# Altium PCB Main-PCB-v1.0.PcbDoc (part 5 of 5)
Units mil, origin at the board's own origin, x right, y up, seen from the top; angles counter-clockwise.
Board outline 8760 x 2778 mil, 2 copper layers (Top Layer, Bottom Layer), stack 57 mil thick; 252 components, 204 nets, 813 pads, 473 vias.
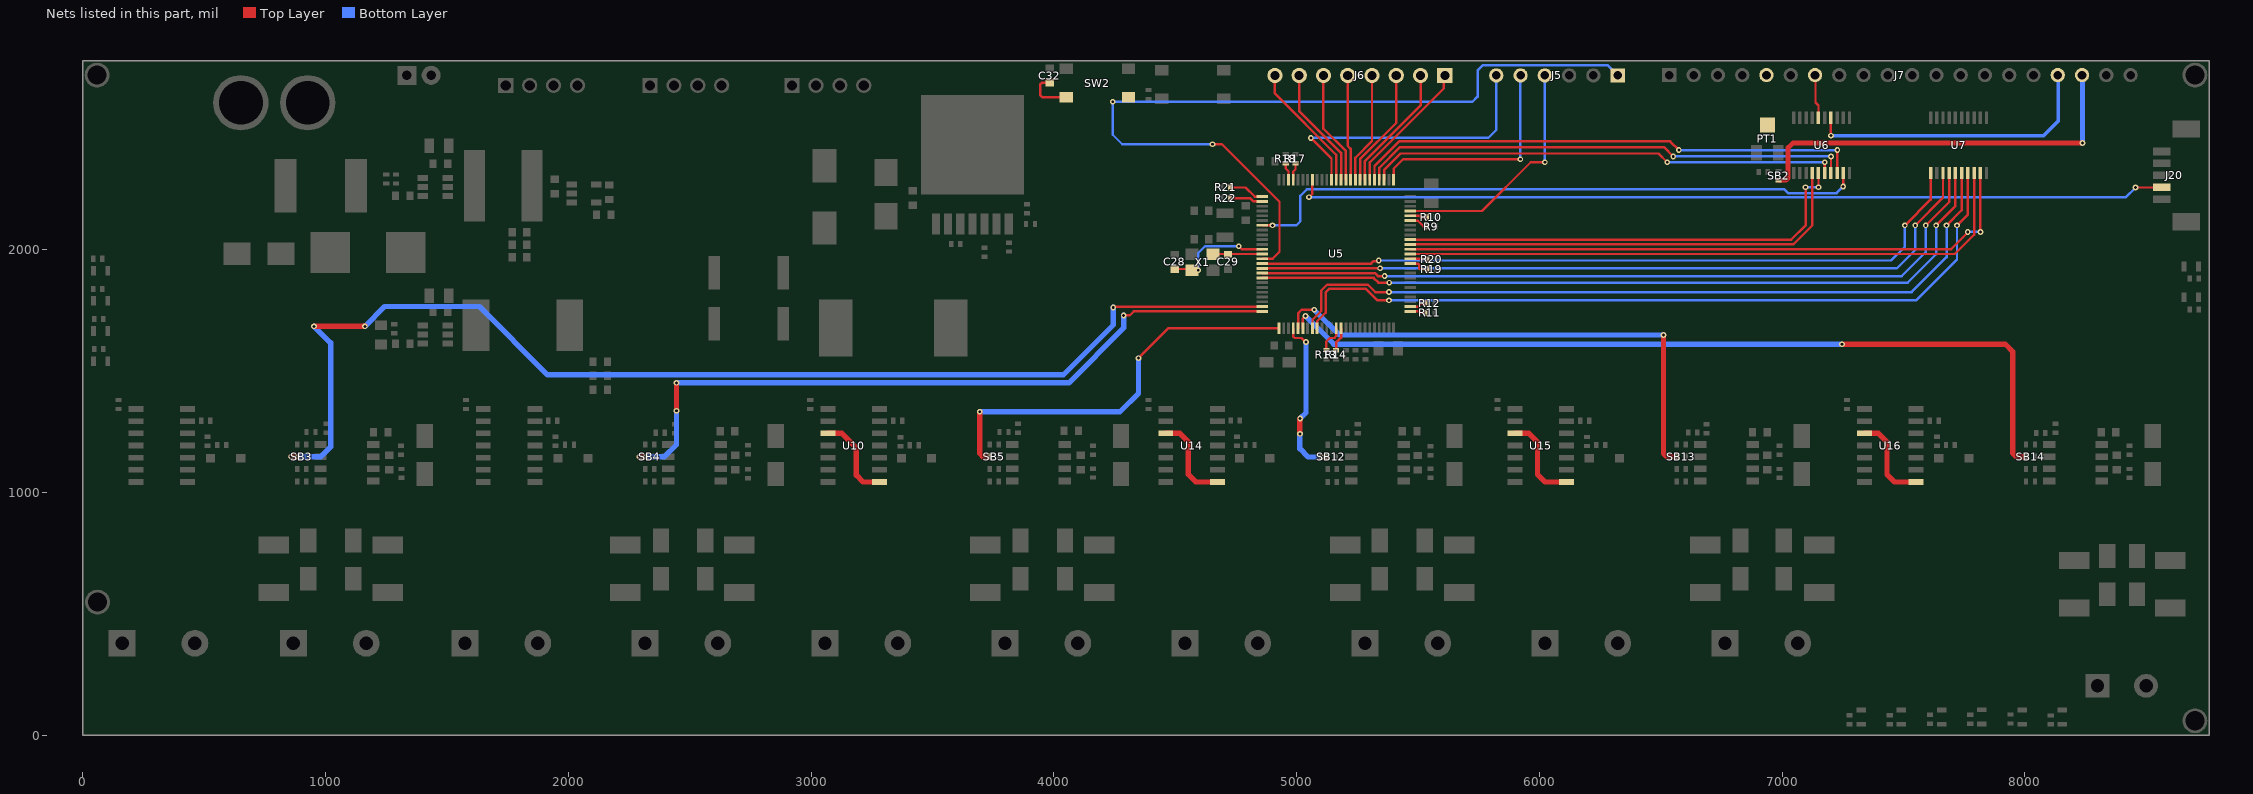
[diagram p3: the nets of this part, all layers, seen from the top]

## Via types
v1: diameter 23.62, hole 11.81, Top Layer to Bottom Layer, 473 vias

## Nets (pads, with @x,y where several pads share a name; then routed paths per layer and width w, separated by ;. In a path a pad name is that pad's centre, name@x,y a point inside that pad or via, vN(x,y) a via of type N, cw(c..) or ccw(c..) an arc to the next point about the centre after c; other vN are vias at no path point) (continued)
NetU10_3: U10.3 U10.8 | length 361.2
  Top Layer w22: U10.3@3069.5,1243 3127.3,1243 3187,1183.3 3187,1071 3215,1043 U10.8@3282.09,1043
NetU14_3: U14.3 U14.8 | length 373.9
  Top Layer w22: U14.3@4461.5,1243 4519.3,1243 4554.3,1208 4554.3,1074 4585.3,1043 U14.8@4674.09,1043
NetU15_3: U15.3 U15.8 | length 373.9
  Top Layer w22: U15.3@5899.8,1243 5957.6,1243 5992.6,1208 5992.6,1074 6023.6,1043 U15.8@6112.39,1043
NetU16_3: U16.3 U16.8 | length 373.9
  Top Layer w22: U16.3@7339.8,1243 7397.6,1243 7432.6,1208 7432.6,1074 7463.6,1043 U16.8@7552.39,1043
NRST: C32.2 J5.1 SW2.1 SW2.2 U5.14 | length 3646.8
  Top Layer w10: C32.2@3983,2687 3951,2687 3944,2680 3944,2637 3954.06,2626.94 SW2.1@4051.79,2626.94 ; v1(4654,2434) 4693,2434 4930,2197 4930,1991 4901.32,1962.32 U5.14@4858.68,1962.32
  Bottom Layer w10: v1(4654,2434) 4282,2434 4243,2473 v1(4243,2609) 5725,2609 5746,2630 5746,2738 5768,2760 6280.56,2760 J5.1@6323,2717.56
PC0: U5.15 U7.1 | length 3022.8
  Top Layer w10: U5.15@4858.68,1942.63 5307.19,1942.63 5316.95,1952.39 5336.39,1952.39 v1(5339,1955) ; v1(7506,2100) 7612.05,2206.05 U7.1@7612.05,2314.83
  Bottom Layer w10: v1(5339,1955) 7449,1955 7506,2012 v1(7506,2100)
PC1: U5.16 U7.3 | length 3084.2
  Top Layer w10: U5.16@4858.68,1922.94 v1@5343.94,1922.94 ; v1(7549,2100) 7663.23,2214.23 U7.3@7663.23,2314.83
  Bottom Layer w10: v1(5344.47,1923.47) 7473.47,1923.47 7549,1999 v1(7549,2100)
PC2: U5.17 U7.4 | length 3144.3
  Top Layer w10: U5.17@4858.68,1903.26 5322.74,1903.26 5335,1891 v1(5363,1891) ; v1(7592,2100) 7688.82,2196.82 U7.4@7688.82,2314.83
  Bottom Layer w10: v1(5363,1891) 7493,1891 7592,1990 v1(7592,2100)
PC3: U5.18 U7.5 | length 3199.6
  Top Layer w10: U5.18@4858.68,1883.57 5317.74,1883.57 5337.31,1864 v1(5382,1864) ; v1(7635,2100) 7714.2,2179.2 7714.2,2314.62 U7.5@7714.41,2314.83
  Bottom Layer w10: v1(5382,1864) 7518,1864 7635,1981 v1(7635,2100)
PC4: U5.33 U7.6 | length 3199.9
  Top Layer w10: U5.33@5065.37,1676.88 5066,1677.51 5066,1711 5102,1747 5102,1831.46 5126.54,1856 5293.46,1856 5324.46,1825 v1(5381,1825) ; v1(7678,2100) 7740,2162 U7.6@7740,2314.83
  Bottom Layer w10: v1(5381,1825) 7534,1825 7678,1969 v1(7678,2100)
PC5: U5.34 U7.7 | length 3231.2
  Top Layer w10: U5.34@5085.06,1676.88 5085,1676.94 5085,1705 5120,1740 5120,1824 5134,1838 5286,1838 5333,1791 v1(5381,1791) ; v1(7721,2100) 7765.59,2144.59 U7.7@7765.59,2314.83
  Bottom Layer w10: v1(5381,1791) 7552,1791 7721,1960 v1(7721,2100)
PC6: U5.63 U7.8 | length 2619.4
  Top Layer w10: U5.63@5468.91,1982 7711.84,1982 7791.18,2061.34 U7.8@7791.18,2325.61
PC7: U5.64 U7.9 | length 2622.4
  Top Layer w10: U5.64@5468.91,2001.68 7696.61,2001.68 7765,2070.07 v1(7765,2073) ; U7.9@7816.77,2314.83 7817.39,2314.21 v1@7817.39,2073
  Bottom Layer w10: v1(7765,2073) v1(7818,2073)
PC8: U5.65 U6.4 | length 1903.3
  Top Layer w10: U5.65@5468.91,2021.37 7046.37,2021.37 7124.61,2099.61 U6.4@7124.61,2314.83
PC9: U5.66 U6.5 | length 1920.6
  Top Layer w10: U5.66@5468.91,2041.06 7038.22,2041.06 7097,2099.84 v1(7097,2257) ; v1(7150.2,2257) U6.5@7150.2,2314.83
  Bottom Layer w10: v1(7097,2257) v1(7150.2,2257)
PC10: U5.78 U6.6 | length 1945
  Top Layer w10: U5.78@5360.65,2287.12 5360.65,2328.65 5428,2396 6491,2396 v1(6527,2360) ; U6.6@7175.8,2314.83 7175.9,2314.93 7175.9,2359.9 v1(7176,2360)
  Bottom Layer w10: v1(6527,2360) v1(7176,2360)
PC11: U5.79 U6.7 | length 2031.2
  Top Layer w10: U5.79@5340.96,2287.12 5340.96,2336.8 5426.16,2422 6514,2422 v1(6552,2384) ; U6.7@7201.39,2314.83 7201.69,2315.13 7201.69,2383.69 v1(7202,2384)
  Bottom Layer w10: v1(6552,2384) v1(7202,2384)
PC12: U5.80 U6.8 | length 2116.9
  Top Layer w10: U5.80@5321.28,2287.12 5321.28,2344.95 5422.32,2446 6539,2446 v1(6575,2410) ; U6.8@7226.98,2314.83 7227.49,2315.34 7227.49,2409.49 v1(7228,2410)
  Bottom Layer w10: v1(6575,2410) v1(7228,2410)
PC13: U5.7 U6.9 | length 2588.6
  Top Layer w10: U5.7@4858.68,2100.11 4877.3,2100 v1(4901,2100) ; v1(7252,2260) 7252.28,2260.28 7252.28,2314.54 U6.9@7252.57,2314.83
  Bottom Layer w10: v1(4901,2100) 4999,2100 5016,2117 5016,2222 5042,2248 7009.8,2248 7024.8,2233 7225,2233 v1(7252,2260)
PD0: J6.1 U5.81 | length 558.6
  Top Layer w10: U5.81@5301.59,2287.12 5301.59,2359.59 5607,2665 5607,2713.56 J6.1@5611,2717.56
PD1: J6.2 U5.82 | length 525.3
  Top Layer w10: U5.82@5281.91,2287.12 5281.91,2364.91 5511,2594 J6.2@5511,2717.56
PD2: J6.3 U5.83 | length 492.1
  Top Layer w10: U5.83@5262.22,2287.12 5262.22,2373.22 5411,2522 J6.3@5411,2717.56
PD3: J6.4 U5.84 | length 458.8
  Top Layer w10: U5.84@5242.54,2287.12 5242.54,2378.54 5311,2447 J6.4@5311,2717.56
PD4: J6.5 U5.85 | length 435.4
  Top Layer w10: J6.5@5211,2717.56 5211,2427 5222.85,2415.15 U5.85@5222.85,2287.12
PD5: J6.6 U5.86 | length 487.3
  Top Layer w10: J6.6@5111,2736.27 5111,2497.68 5203.17,2405.51 U5.86@5203.17,2287.12
PD6: J6.7 U5.87 | length 512.8
  Top Layer w10: J6.7@5011,2728.46 5011,2570.84 5183.48,2398.36 U5.87@5183.48,2287.12
PD7: J6.8 U5.88 | length 546.5
  Top Layer w10: J6.8@4911,2728.94 4911,2643 5163.8,2390.2 U5.88@5163.8,2287.12
RS485_CH1_DE_RE: SB3.1 U5.24 | length 4945.4
  Top Layer w10: v1(4245,1762) 4247.56,1764.56 4857.77,1764.56 U5.24@4858.68,1765.46
  Top Layer w22: v1(858.59,1147) SB3.1@884.3,1147 ; v1(953,1684) 1159.56,1684 1161.56,1686 v1@1162,1686
  Bottom Layer w22: v1(858.59,1147) 981,1147 1021,1187 1021,1616 v1(953,1684) ; v1(1162,1684) 1243.46,1765.46 1633.54,1765.46 1915,1484 4039,1484 4245,1690 v1(4245,1762)
RS485_CH2_DE_RE: SB4.1 U5.25 | length 3015.1
  Top Layer w10: v1(4288,1729) 4313,1729 4329.78,1745.78 U5.25@4858.68,1745.78
  Top Layer w22: v1(2293.81,1147) SB4.1@2316.3,1147 ; v1(2446,1336) v1(2446,1451)
  Bottom Layer w22: v1(2293.81,1147) 2396.77,1147 2446,1196.23 v1(2446,1336) ; v1(2446,1451) 4062,1451 4288,1677 v1(4288,1729)
RS485_CH3_DE_RE: SB5.1 U5.26 | length 1678.9
  Top Layer w10: v1(4349,1553) 4472.88,1676.88 U5.26@4927.57,1676.88
  Top Layer w22: v1(3695,1332) 3695,1159.89 3707.89,1147 SB5.1@3736.5,1147
  Bottom Layer w22: v1@3695.44,1332 4273,1332 4349,1408 v1(4349,1553)
RS485_CH4_DE_RE: SB12.1 U5.29 | length 670.4
  Top Layer w10: U5.29@4986.63,1676.88 4986.63,1641.86 4992.49,1636 5020.7,1636 5037.7,1619 v1(5039,1619)
  Top Layer w22: v1@5014,1241.44 5014,1302.56 5015,1303.56 v1(5015,1304) ; v1(5103,1146) SB12.1@5124.5,1146
  Bottom Layer w22: v1(5014,1241) 5014,1180 5048,1146 v1(5103,1146) ; v1(5015,1304) 5039,1328 v1(5039,1619)
RS485_CH5_DE_RE: SB13.1 U5.30 | length 2163
  Top Layer w10: U5.30@5006.32,1676.88 5006.32,1737.32 5021,1752 v1(5073,1752)
  Top Layer w22: v1(6512,1648) 6512,1159.89 6524.89,1147 SB13.1@6566.3,1147
  Bottom Layer w22: v1(5073,1752) 5177,1648 v1(6512,1648)
RS485_CH6_DE_RE: SB14.1 U5.31 | length 3508.7
  Top Layer w10: U5.31@5026,1676.88 5026,1716 v1(5037,1727)
  Top Layer w22: v1(7247,1610) 7920,1610 7951,1579 7951,1159.89 7963.89,1147 SB14.1@8005.3,1147
  Bottom Layer w22: v1(5037,1727) 5154,1610 v1(7247,1610)
RST_LCD: J7.17 U6.14 | length 1224.5
  Top Layer w10: v1(7201.39,2469.39) U6.14@7201.39,2543.17
  Bottom Layer w15: v1(7201.39,2469.39) 8077.39,2469.39 8138,2530 J7.17@8138,2719
RW_LCD: J7.7 U6.16 | length 180.9
  Top Layer w10: J7.7@7138,2719 7138,2606 7150.2,2593.8 U6.16@7150.2,2543.17
SWCLK: J5.5 U5.76 | length 930.1
  Top Layer w10: U5.76@5400.02,2287.12 5400.02,2333.16 5438.86,2372 v1(5922,2372)
  Bottom Layer w10: v1(5922,2372) 5922.5,2372.5 5922.5,2717.06 J5.5@5923,2717.56
SWDIO: J5.4 U5.72 | length 995.3
  Top Layer w10: U5.72@5468.91,2159.17 5764.17,2159.17 5965,2360 v1(6023,2360)
  Bottom Layer w10: J5.4@6023,2717.56 6023,2361 v1@6024,2360
SWO: J5.6 U5.89 | length 1210.5
  Top Layer w10: v1(5059,2460) 5144.11,2374.89 U5.89@5144.11,2287.12
  Bottom Layer w10: v1(5059,2460) 5790.14,2460 5823,2492.86 J5.6@5823,2717.56
UART4_RX: R9.1 U5.70 | length 84.5
  Top Layer w10: U5.70@5468.91,2119.8 5469.14,2119.57 5499.43,2119.57 5524,2095 R9.1@5536.3,2095 5536.3,2096.21 R9.1@5532.3,2100.21
UART4_TX: R10.1 U5.71 | length 69.7
  Top Layer w10: U5.71@5468.91,2139.48 5507.52,2139.48 5513,2134 R10.1@5536.3,2134
UART5_RX: R11.1 U5.51 | length 65.2
  Top Layer w10: U5.51@5468.91,1745.78 5505.22,1745.78 5512,1739 R11.1@5531.3,1739
UART5_TX: R12.1 U5.52 | length 68.4
  Top Layer w10: U5.52@5468.91,1765.46 5501.52,1765.46 5513.15,1777.09 5528.39,1777.09 R12.1@5531.3,1780
UART7_RX: R13.1 U5.38 | length 119.1
  Top Layer w10: R13.1@5122.8,1585.5 5122.8,1620.8 5138,1636 5156,1636 5164,1644 5164,1676.68 U5.38@5163.8,1676.88
UART7_TX: R14.1 U5.39 | length 99.8
  Top Layer w10: R14.1@5163.05,1585.5 5163.05,1617.05 5183.48,1637.48 U5.39@5183.48,1676.88
UART8_RX: R17.1 U5.97 | length 73.2
  Top Layer w10: U5.97@4986.63,2287.12 4986.63,2321.63 4995.8,2330.8 R17.1@4995.8,2356.5
UART8_TX: R18.1 U5.98 | length 74
  Top Layer w10: R18.1@4955.8,2356.5 4955.8,2334.2 4966.94,2323.06 U5.98@4966.94,2287.12
UART9_RX: R19.1 U5.61 | length 93.9
  Top Layer w10: U5.61@5468.91,1942.63 5500.63,1942.63 5505,1938.26 5505,1923 5509,1919 R19.1@5538,1919 5538,1919.4 R19.1@5534,1923.4
UART9_TX: R20.1 U5.62 | length 68.8
  Top Layer w10: U5.62@5468.91,1962.31 5535.31,1962.31 R20.1@5537,1964
UART10_RX: R21.1 U5.1 | length 147.1
  Top Layer w10: R21.1@4727.3,2256 4790,2256 4827.86,2218.14 4858.6,2218.14 U5.1@4858.68,2218.22
UART10_TX: R22.1 U5.2 | length 137.5
  Top Layer w10: R22.1@4726.3,2211 4810,2211 4822.46,2198.54 U5.2@4858.68,2198.54
V0: J7.5 PT1.2
V_EN: J20.2 U5.93 | length 3607.1
  Top Layer w10: v1(5051,2216) 5065.37,2230.37 U5.93@5065.37,2287.12 ; v1(8456,2256) 8563.87,2256 J20.2@8564.61,2256.73
  Bottom Layer w10: v1(5051,2216) 8417,2216 v1@8456,2255
VEE: J7.18 SB2.1 | length 1669.2
  Top Layer w20: SB2.1@6986.2,2285.5 7016.5,2285.5 7025,2294 7025,2420 7044,2439 v1(8238,2439)
  Bottom Layer w22: v1(8238,2439) J7.18@8238,2719
XTAL_IN: C28.2 U5.12 X1.1 | length 448
  Top Layer w10: C28.2@4500.8,1920 4564.02,1920 X1.1@4569.49,1914.54 4569.95,1915 v1(4595,1915) ; v1(4762,2014) 4774.31,2001.69 U5.12@4858.68,2001.69
  Bottom Layer w10: v1(4595,1915) 4595,1986 4623,2014 v1(4762,2014)
XTAL_OUT: C29.2 U5.13 X1.3 | length 202.8
  Top Layer w10: X1.3@4656.1,1981.46 4656.64,1982 U5.13@4858.68,1982
pads on no net: U5.3 U5.4 U5.5 U5.23 U5.32 U5.35 U5.36 U5.37 U5.43 U5.44 U5.45 U5.46 U5.47 U5.53 U5.54 U5.55 U5.56 U5.57 U5.58 U5.59 U5.60 U5.67 U5.68 U5.69 U5.77 U5.90 U5.95 U5.96 U6.1 U6.3 U6.18 U6.20

## Polygon pours and split planes (outlines as drawn)
GND on Bottom Layer "GND_L02_P001" (solid, remove dead copper, pour order 1): 99,2676 8660,2676 8660,100 8659,100 99,100
GND on Top Layer "GND_L01_P000" (solid, remove dead copper, pour order 0): 99,2676 8660,2676 8660,100 8659,100 99,100

## Other copper
Top Layer:
  rectangle net 12V: 25,635 188,724.86
  region net 12V: 123.86,725 123.86,404.14 190,404.14 190,725
  region net 12V: 25.86,1455.14 25.86,669 107,669 107,1455.14
  region net 12V: 363.14,1477 26,1477 26,1421.14 363.14,1421.14
  region net 12V: 809,1507.14 162,1507.14 162,1421 809,1421
  region net 12V: 2005,1474 2005,1540.7 162,1540.7 162,1474
  rectangle net MCU_UART1_RX: 186,1127 266,1205
  rectangle net NetC3_1: 1478,1634 1582.09,1668
  rectangle net NetC3_1: 1560,1549 1679,1795
  rectangle net 12V: 1197,1476 1260,1630
  rectangle net 24V: 3913,2042 3993,2120
  rectangle net NetC15_1: 3259,2001 3594,2044
  rectangle net NetC15_1: 3242,2001 3377,2197
  rectangle net NetC15_1: 3503,1558 3594,2040
  region net 12V: 1760,477 1424,477 1424,4 1760,4
  region net 12V: 347.27,477 11.27,477 11.27,4 347.27,4
  region net 12V: 1760,4 1760,286 12,286 12,4
  region net 24V: 6173.53,5 6173.53,287 4425.53,287 4425.53,5
  region net 24V: 4760.8,478 4306.2,478 4306.2,5 4760.8,5
  region net 24V: 6173.53,478 5837.53,478 5837.53,5 6173.53,5
  region net 24V: 4655.67,5 4655.67,287 2907.67,287 2907.67,5
  rectangle net 24V: 2793,5 3243.67,478
  rectangle net BATT: 2942,1988 3159,2198
  rectangle net GND: 8408,2648 8612,2763
  region net 24V: 3126.67,439 2800,439 2800,320 3126.67,320
  rectangle net 24V: 2792,325 2900,977
  rectangle net 24V: 2193,923 2244,1583
  rectangle net NetD1_2: 748,1901 1172,2093
  rectangle net NetD1_2: 1068,1901 1172,2379
  rectangle net BATT: 1069,2478 1552,2646
  rectangle net 24V: 2193,1543 3187,1796
  rectangle net BATT: 3394,2163 3419,2203
  rectangle net 3.3V: 4771,2560 4852,2768
  rectangle net NRST: 4023,2588 4338,2650
  rectangle net RS485_CH3_DE_RE: 3722.19,1134 3750,1160
  rectangle net GND: 8408,2387 8722,2648
  rectangle net MCU_UART3_TX: 5149.25,1539 5176.25,1562
  rectangle net MCU_UART3_RX: 5109,1539 5136,1562
  rectangle net GND: 8609,2001 8722,2536
  rectangle net 3.3V: 4643,1329 5467.3,1431
  rectangle net 5V: 1806,1945 1896,2619
  rectangle net GND: 1432,2199 1468,2233
  rectangle net 5V: 1237,2231 1264,2283
  rectangle net GND: 1278,2261.5 1305,2283.5
  rectangle net GND: 1387,2336 1468,2462
  rectangle net GND: 5748,487 5952,1061
  rectangle net GND: 6254.53,320 6476.53,956
  rectangle net GND: 5748,487 6476.53,956
  rectangle net GND: 4429,487 4539,1062
  rectangle net GND: 4771.6,320 4993.6,956
  rectangle net GND: 4429,487 4993.6,956
  rectangle net GND: 2914,487 3166.67,1058
  rectangle net GND: 3288.67,320 3510.67,956
  rectangle net GND: 3082.67,487 3510.67,956
  rectangle net GND: 1554,487 1683.73,1058
  rectangle net GND: 1805.73,320 2027.73,956
  rectangle net GND: 1599.73,487 2027.73,956
  rectangle net GND: 210,487 615,956
  rectangle net GND: 393,320 615,956
  rectangle net GND: 187,743 296,1058
  rectangle net 3.3V: 1830.2,1319 2120,1395
  rectangle net RS485_CH6_DE_RE: 7996,1134 8017,1160
  rectangle net RS485_CH5_DE_RE: 6557,1134 6578,1160
  rectangle net 3.3V: 6202,2110 7071,2256
  rectangle net 3.3V: 6202,2110 6490,2377
  rectangle net 5V: 8537,2187.52 8601,2227.52
  rectangle net XTAL_IN: 4480,1890 4607,1938
  rectangle net 3.3V: 4835,1799 4903.42,1831
  region net MCU_UART6_RX: 4701.3,2266 4679.3,2266 4679.3,2241 4701.3,2241
  rectangle net GND: 4773,2149 4808,2196
  rectangle net 3.3V: 1907,2324 2193.8,2486
  rectangle net GND: 1999,2581 2554,2635
  rectangle net GND: 1999,2601 2073,2768
  rectangle net GND: 2593,2601 2667,2768
  rectangle net MCU_UART5_RX: 5564,1906 5584,1932
  rectangle net MCU_UART4_RX: 4983,2379 5009,2402.56
  rectangle net MCU_UART4_TX: 4943,2379 4969,2402.56
  region net MCU_UART2_TX: 5579.3,1792 5557.3,1792 5557.3,1764 5579.3,1764
  rectangle net MCU_UART2_RX: 5557.3,1729 5579.3,1754
  rectangle net GND: 2136,1282 2185,1561
  rectangle net MCU_UART1_RX: 5560,2082 5584.65,2108
  rectangle net MCU_UART1_TX: 5560,2121 5584.65,2147
  rectangle net GND: 514.5,1282 536.5,1304
  rectangle net GND: 1944.3,1282 2184,1311
  rectangle net GND: 3365.3,1282 3387.3,1304
  rectangle net GND: 4755.5,1283 4777.5,1305
  rectangle net GND: 6194.3,1282 6216.3,1304
  rectangle net GND: 7634.3,1282 7656.3,1311
  region net 3.3V: 7925,1405 7193,1405 7193,1364 7925,1364
  rectangle net 3.3V: 7520,1329 7678,1395
  region net 3.3V: 6147,1405 5759,1405 5759,1364 6147,1364
  rectangle net 3.3V: 6081,1329 6147,1395
  region net 3.3V: 4709,1451 3292,1451 3292,1364 4709,1364
  rectangle net 3.3V: 4643,1329 4709,1395
  region net 3.3V: 3315,1451 2601,1451 2601,1364 3315,1364
  rectangle net 3.3V: 3249,1329 3315,1395
  region net 3.3V: 1896.21,1395 987,1395 987,1364 1896.21,1364
  rectangle net 3.3V: 400,1329 466,1395
  region net 3.3V: 466,1395 133,1395 133,1364 466,1364
  region net NetLED3_2: 7264.65,55.5 7264.65,28.5 7350.65,28.5 7350.65,55.5
  region net NetLED6_2: 7430.42,55.5 7430.42,28.5 7516.42,28.5 7516.42,55.5
  region net NetLED7_2: 7596.18,57.5 7596.18,30.5 7682.18,30.5 7682.18,57.5
  region net NetLED10_2: 7761.95,57.5 7761.95,30.5 7847.95,30.5 7847.95,57.5
  region net NetLED8_2: 7927.72,58.5 7927.72,31.5 8013.72,31.5 8013.72,58.5
  region net NetLED11_2: 8093.49,54.5 8093.49,27.5 8179.49,27.5 8179.49,54.5
  rectangle net 3.3V: 1300,1026 1326,1069
  rectangle net 3.3V: 2728,1025 2754,1068
  rectangle net 3.3V: 4149.2,1027.5 4175.2,1070.5
  rectangle net 3.3V: 5539.2,1027 5565.2,1070
  rectangle net 3.3V: 6977,1026 7003,1069
  rectangle net 3.3V: 8419,1026 8445,1069
  region net NetLED12_2: 8727.5,1826.22 8700.5,1826.22 8700.5,1740.22 8727.5,1740.22
  region net NetLED9_2: 8727.5,1952.85 8700.5,1952.85 8700.5,1866.85 8727.5,1866.85
  rectangle net 3.3V: 4417,2713 4852,2768
  rectangle net GND: 4369,2649 4408,2768
  rectangle net GND: 3833,2722 4408,2768
  rectangle net GND: 72,1702.11 93,1727.11
  rectangle net GND: 72,1578.22 93,1603.22
  rectangle net GND: 69,1949.89 90,1974.89
  rectangle net GND: 69,1826 90,1851
  rectangle net GND: 2514,1821 2934,2361
  rectangle net NetLED5_2: 32,1890.33 59,1976.33
  rectangle net NetLED2_2: 32,1766.22 59,1852.22
  rectangle net NetLED4_2: 32,1642.11 59,1728.11
  rectangle net NetLED1_2: 32,1518 59,1604
  rectangle net EARTH: 895,595 1151,695
  region net NetD7_2: 965.5,853 720.5,853 720.5,748 965.5,748
  rectangle net NetD7_1: 1072,748 1319,853
  rectangle net EARTH: 2348,595 2599,695
  region net NetD8_2: 2418.5,853 2173.5,853 2173.5,748 2418.5,748
  rectangle net NetD8_1: 2525,748 2770,853
  rectangle net NetF3_2: 1191.87,320 1320.87,624
  rectangle net NetF3_2: 1098.87,320 1320.87,439
  region net NetF2_2: 944.87,439 722.87,439 722.87,320 944.87,320
  region net NetF2_2: 851.87,624 722.87,624 722.87,320 851.87,320
  rectangle net NetF5_2: 2640.2,320 2769.2,624
  rectangle net NetF5_2: 2547.2,320 2769.2,439
  region net NetF4_2: 2393.2,439 2171.2,439 2171.2,320 2393.2,320
  region net NetF4_2: 2300.2,624 2171.2,624 2171.2,320 2300.2,320
  rectangle net NetF7_2: 4123.13,320 4252.13,624
  rectangle net NetF7_2: 4030.13,320 4252.13,439
  region net NetF6_2: 3876.13,439 3654.13,439 3654.13,320 3876.13,320
  region net NetF6_2: 3783.13,624 3654.13,624 3654.13,320 3783.13,320
  rectangle net NetD9_1: 3993,748 4251,853
  region net NetD9_2: 3915,853 3654.5,853 3654.5,748 3915,748
  rectangle net EARTH: 3829,595 4080,695
  rectangle net NetD19_1: 5486,748 5735,853
  region net NetD19_2: 5379.5,853 5134.5,853 5134.5,748 5379.5,748
  rectangle net EARTH: 5309,595 5564,695
  rectangle net NetF9_2: 5606.07,320 5735.07,624
  rectangle net NetF9_2: 5513.07,320 5735.07,439
  region net NetF8_2: 5359.07,439 5137.07,439 5137.07,320 5359.07,320
  region net NetF8_2: 5266.07,624 5137.07,624 5137.07,320 5266.07,320
  rectangle net EARTH: 6795,595 7042,695
  region net NetF10_2: 6749,624 6620,624 6620,320 6749,320
  region net NetF10_2: 6842,439 6620,439 6620,320 6842,320
  rectangle net NetF11_2: 6996,320 7218,439
  rectangle net NetF11_2: 7089,320 7218,624
  region net NetD20_2: 6865.5,853 6620.5,853 6620.5,748 6865.5,748
  rectangle net NetD20_1: 6972,748 7217,853
  rectangle net EARTH: 8302,524 8498,632
  region net NetD21_2: 8376.59,788 8137.59,788 8137.59,681 8376.59,681
  rectangle net NetD21_1: 8426,681 8665,788
  region net NetF12_2: 8268.59,557 8134.59,557 8134.59,145 8268.59,145
  region net NetF12_2: 8365.59,262 8134.59,262 8134.59,145 8365.59,145
  rectangle net NetF13_2: 8438,145 8669,262
  rectangle net NetF13_2: 8535,145 8669,557
  region net NetC41_2: 7793.6,1209 7695.3,1209 7695.3,1121 7793.6,1121
  rectangle net NetR77_2: 8032.3,1182 8127.3,1214
  region net NetR77_2: 8032.3,1265 8032.3,1182 8064.3,1182 8064.3,1265
  rectangle net NetR71_1: 7619.6,1218 7641.6,1240
  rectangle net MCU_UART6_RX: 7307.6,1131 7373.6,1210
  region net MCU_UART6_TX: 8015.89,1058 7993.89,1058 7993.89,1034 8015.89,1034
  rectangle net MCU_UART6_RX: 7993.89,1183 8015.89,1207
  region net NetD21_1: 8449.6,1119 8291.19,1119 8291.19,1077 8449.6,1077
  region net NetD21_2: 8449.6,1169 8291.19,1169 8291.19,1130 8449.6,1130
  region net 3.3V: 8345.6,1304 8291.19,1304 8291.19,1182 8345.6,1182
  region net 3.3V: 8345.6,2420 8110.13,2420 8110.13,1272 8345.6,1272
  region net NetR76_1: 8149.9,1259 8077.43,1259 8077.43,1227 8149.9,1227
  rectangle net NetR80_2: 8029.3,1083 8128,1165
  rectangle net NetR71_1: 8030.6,1030 8129.3,1062
  rectangle net NetD18_2: 7521.6,1121 7686.6,1159
  rectangle net NetD18_2: 7614.6,1121 7686.6,1209
  region net MCU_UART6_TX: 7373.59,1356 7253.6,1356 7253.6,1325 7373.59,1325
  rectangle net NetC41_2: 7518.6,1280 7617.6,1311
  rectangle net NetR80_1: 7992.04,1083 8016.6,1109
  region net GND: 8450.71,1304 8354.3,1304 8354.3,1182 8450.71,1182
  region net GND: 7010.71,1304 6914.3,1304 6914.3,1182 7010.71,1182
  rectangle net NetR79_1: 6552.04,1083 6576.6,1109
  rectangle net NetC40_2: 6078.6,1280 6177.6,1311
  region net MCU_UART5_TX: 5933.59,1356 5813.6,1356 5813.6,1325 5933.59,1325
  rectangle net NetD17_2: 6174.6,1121 6246.6,1209
  rectangle net NetD17_2: 6081.6,1121 6246.6,1159
  rectangle net NetR70_1: 6590.6,1030 6689.3,1062
  rectangle net NetR79_2: 6590.6,1080 6689.3,1162
  region net NetR74_1: 6709.9,1259 6637.43,1259 6637.43,1227 6709.9,1227
  region net 3.3V: 6905.6,1304 6670.13,1304 6670.13,1272 6905.6,1272
  region net 3.3V: 6905.6,1304 6851.19,1304 6851.19,1182 6905.6,1182
  region net NetD20_2: 7009.6,1169 6851.19,1169 6851.19,1130 7009.6,1130
  region net NetD20_1: 7009.6,1119 6851.19,1119 6851.19,1077 7009.6,1077
  rectangle net MCU_UART5_RX: 6553.89,1183 6575.89,1207
  region net MCU_UART5_TX: 6575.89,1058 6553.89,1058 6553.89,1034 6575.89,1034
  rectangle net MCU_UART5_RX: 5867.6,1131 5933.6,1210
  rectangle net NetR70_1: 6179.6,1218 6201.6,1240
  region net NetR75_2: 6594.3,1265 6594.3,1182 6626.3,1182 6626.3,1265
  rectangle net NetR75_2: 6594.3,1182 6689.3,1214
  region net NetC40_2: 6353.6,1209 6255.3,1209 6255.3,1121 6353.6,1121
  region net NetC39_2: 4915.3,1209 4817,1209 4817,1121 4915.3,1121
  rectangle net NetR73_2: 5156,1182 5251,1214
  region net NetR73_2: 5156,1265 5156,1182 5188,1182 5188,1265
  rectangle net NetR69_1: 4741.3,1218 4763.3,1240
  rectangle net MCU_UART4_RX: 4429.3,1131 4495.3,1210
  region net MCU_UART4_TX: 5137.59,1058 5115.59,1058 5115.59,1034 5137.59,1034
  rectangle net MCU_UART4_RX: 5115.59,1183 5137.59,1207
  region net NetD19_1: 5571.3,1119 5412.89,1119 5412.89,1077 5571.3,1077
  region net NetD19_2: 5571.3,1169 5412.89,1169 5412.89,1130 5571.3,1130
  region net 3.3V: 5467.3,1304 5412.89,1304 5412.89,1182 5467.3,1182
  region net 3.3V: 5467.3,1361 5231.83,1361 5231.83,1272 5467.3,1272
  region net NetR72_1: 5271.6,1259 5199.13,1259 5199.13,1227 5271.6,1227
  rectangle net NetR78_2: 5152.3,1080 5251,1162
  rectangle net NetR69_1: 5152.3,1030 5251,1062
  rectangle net NetD16_2: 4643.3,1121 4808.3,1159
  rectangle net NetD16_2: 4736.3,1121 4808.3,1209
  region net MCU_UART4_TX: 4495.29,1356 4375.3,1356 4375.3,1325 4495.29,1325
  rectangle net NetC39_2: 4640.3,1280 4739.3,1311
  rectangle net NetR78_1: 5113.74,1083 5138.3,1109
  region net GND: 5572.41,1304 5476,1304 5476,1182 5572.41,1182
  region net GND: 4180.41,1304 4084,1304 4084,1182 4180.41,1182
  rectangle net NetR47_1: 3721.74,1083 3746.3,1109
  rectangle net NetC35_2: 3248.3,1280 3347.3,1311
  region net MCU_UART3_TX: 3103.29,1356 2983.3,1356 2983.3,1325 3103.29,1325
  rectangle net NetD6_2: 3344.3,1121 3416.3,1209
  rectangle net NetD6_2: 3251.3,1121 3416.3,1159
  region net NetC35_2: 3523.3,1209 3429.89,1209 3429.89,1121 3523.3,1121
  rectangle net NetR38_1: 3760.3,1030 3855.3,1062
  rectangle net NetR47_2: 3760.3,1080 3855.3,1162
  rectangle net NetR44_2: 3760.3,1180 3855.3,1212
  region net NetR44_2: 3757.3,1263 3757.3,1180 3789.3,1180 3789.3,1263
  region net NetR43_1: 3870.3,1263 3797.83,1263 3797.83,1231 3870.3,1231
  region net 3.3V: 4075.3,1372 3839.83,1372 3839.83,1272 4075.3,1272
  region net 3.3V: 4075.3,1304 4019,1304 4019,1182 4075.3,1182
  region net NetD9_2: 4179.3,1169 4020,1169 4020,1130 4179.3,1130
  region net NetD9_1: 4179.3,1120 4020,1120 4020,1078 4179.3,1078
  rectangle net MCU_UART3_RX: 3723.59,1183 3745.59,1207
  region net MCU_UART3_TX: 3745.59,1058 3723.59,1058 3723.59,1034 3745.59,1034
  rectangle net MCU_UART3_RX: 3037.3,1131 3103.3,1210
  rectangle net NetR38_1: 3349.3,1218 3371.3,1240
  rectangle net NetR37_1: 2342,1030 2437,1062
  rectangle net NetR46_2: 2342,1080 2437,1162
  rectangle net NetR42_2: 2342,1180 2437,1212
  region net NetR42_2: 2339,1263 2339,1180 2371,1180 2371,1263
  region net NetR41_1: 2452,1263 2379.53,1263 2379.53,1231 2452,1231
  region net 3.3V: 2657,1304 2339,1304 2339,1272 2657,1272
  region net 3.3V: 2657,1451 2466,1451 2466,1182 2657,1182
  region net GND: 2762,1304 2665.59,1304 2665.59,1182 2762,1182
  region net NetD8_2: 2761,1169 2602.59,1169 2602.59,1130 2761,1130
  region net NetD8_1: 2761,1119 2602.59,1119 2602.59,1077 2761,1077
  rectangle net MCU_UART2_RX: 2305.3,1183 2327.3,1207
  region net MCU_UART2_TX: 2327.3,1058 2305.3,1058 2305.3,1034 2327.3,1034
  rectangle net RS485_CH2_DE_RE: 2303.44,1134 2328,1160
  rectangle net NetR46_1: 2303.44,1083 2328,1109
  region net NetC34_2: 2103.6,1209 2010.19,1209 2010.19,1121 2103.6,1121
  rectangle net NetD5_2: 1924.6,1121 1996.6,1209
  rectangle net NetD5_2: 1831.6,1121 1996.6,1159
  rectangle net NetR37_1: 1929.6,1218 1951.6,1240
  rectangle net NetR36_1: 499,1218 521,1240
  rectangle net NetC34_2: 1828.6,1280 1927.6,1311
  region net MCU_UART2_TX: 1683.59,1356 1563.6,1356 1563.6,1325 1683.59,1325
  rectangle net MCU_UART2_RX: 1617.6,1131 1683.6,1210
  rectangle net MCU_UART1_RX: 187,1127 321,1167
  rectangle net NetR45_1: 871.44,1083 896,1109
  rectangle net RS485_CH1_DE_RE: 871.44,1134 896,1160
  region net MCU_UART1_TX: 895.3,1058 873.3,1058 873.3,1034 895.3,1034
  rectangle net MCU_UART1_RX: 873.3,1183 895.3,1207
  region net NetD7_1: 1329,1119 1170.59,1119 1170.59,1077 1329,1077
  region net NetD7_2: 1329,1169 1170.59,1169 1170.59,1130 1329,1130
  region net GND: 1330,1304 1233.59,1304 1233.59,1182 1330,1182
  region net 3.3V: 1225,1304 1170.59,1304 1170.59,1182 1225,1182
  region net 3.3V: 1225,1395 914,1395 914,1272 1225,1272
  region net NetR39_1: 1020,1263 947.53,1263 947.53,1231 1020,1231
  region net NetR40_2: 907,1263 907,1180 939,1180 939,1263
  rectangle net NetR40_2: 910,1180 1005,1212
  rectangle net NetR45_2: 910,1080 1005,1162
  rectangle net NetR36_1: 910,1030 1005,1062
  region net NetC33_2: 673,1209 579.59,1209 579.59,1121 673,1121
  rectangle net NetD4_2: 401,1121 566,1159
  rectangle net NetD4_2: 494,1121 566,1209
  region net MCU_UART1_TX: 293,1356 133,1356 133,1325 293,1325
  rectangle net NetC33_2: 398,1280 498,1311
  rectangle net GND: 5394,1536 5442,1626
  rectangle net GND: 5190,1536 5442,1557
  region net 3.3V: 5015.8,1623 4940.8,1623 4940.8,1514 5015.8,1514
  rectangle net GND: 4848,1514 4923,1623
  region net GND: 4776,1941 4627.8,1941 4627.8,1890 4776,1890
  region net GND: 4605,1955 4605,2180.43 4481,2180.43 4481,1955
  rectangle net NetC30_1: 4623,2129.43 4742,2180.43
  rectangle net NetC31_1: 4623,2020 4742,2071
  region net NetC15_1: 3589,2013 3589,2037 3568.8,2037 3568.8,2013
  rectangle net BATT: 3544.8,2060 3584.8,2133
  rectangle net NetC15_2: 3603.8,2011 3625.8,2033
  rectangle net NetR6_2: 3702,1995.5 3728,2016.5
  rectangle net NetC12_2: 3802,2017 3828,2038
  rectangle net NetR5_2: 3872,2021 3901,2160
  rectangle net GND: 3186,2498 3875,2768
  rectangle net GND: 2514,2228 3874,2635
  rectangle net NetD1_1: 1182,1902 1443,2140
  rectangle net 3.3V: 4883,2263 4934,2448
  rectangle net NetPT1_1: 6933,2307 7007,2432
  rectangle net V0: 6905,2477 6978,2755
  rectangle net GND: 508.41,1722 1460,1844
  rectangle net BATT: 1479,1675 1541,1889
  rectangle net NetR1_1: 1204,1675 1423,1706
  rectangle net 12V: 1949,1404 2120,1794
  rectangle net GND: 1466,1945 1543,2233
  rectangle net GND: 1487,1945 1789,2094
  region net 5V: 2046,2143 2046,2206 1954,2206 1954,2143
  region net 3.3V: 2370,2234 2370,2486 2084,2486 2084,2234
  rectangle net GND: 2145,1821 2597,2224
  rectangle net NetC7_2: 2084,2119 2138,2211
  rectangle net 5V: 1878,2255 2037,2315
  rectangle net GND: 1927,2219 2035,2243
  rectangle net 5V: 1646,2444 1896,2619
  rectangle net 5V: 1646,2444 1788,2762
  rectangle net BATT: 1389,2478 1552,2773
  rectangle net BATT: 1479,2279 1552,2773
  rectangle net GND: 508.41,1722 723,2181
  rectangle net GND: 508.41,2147 774.41,2765
  rectangle net BATT#: 784,2147 1050,2765
  pour cut-out: 1558,1928 2068,1928 2068,1451 1558,1451
  pour cut-out: 3025,1971 3648,1971 3648,1382 3025,1382
Bottom Layer:
  rectangle net GND: 6882,985 6965,1225
  rectangle net NetD1_1: 1182,2639 1385,2766
  rectangle net NetD1_1: 1182,2051 1224,2766
  region net BATT#: 1050,2764 784,2764 784,2146 1050,2146
  rectangle net 24V: 2192,761 2917,983
  rectangle net 5V: 2252,2208 3953,2303
  rectangle net BATT: 1068,1811 1172,2773
  rectangle net BATT: 1068,1811 3592,1977
  rectangle net 24V: 3927,1543 4062,2120
  rectangle net 24V: 2193,1543 4062,1794
  rectangle net BATT: 2941,1825 3592,2200
  rectangle net 3.3V: 4772,2423 4934,2590
  region net GND: 6534,478 6180.67,478 6180.67,5 6534,5
  rectangle net 3.3V: 7258,2367 8193,2426
  rectangle net 3.3V: 8110,2230 8193,2426
  rectangle net 3.3V: 7681,1363 8450,1405
  rectangle net 3.3V: 4930,1336 5019,1594
  rectangle net GND: 8652,156 8754,2151
  rectangle net GND: 6200,5 8618,63
  rectangle net GND: 8609,1991 8722,2151
  rectangle net EARTH: 951,599 6962,695
  rectangle net 5V: 1231,2051 1654,2147
  region net 5V: 2371,2707.48 2223.72,2707.48 2223.72,2051 2371,2051
  rectangle net 5V: 1646,2057 1788,2762
  rectangle net 5V: 1647,2051 2365.72,2420
  rectangle net 3.3V: 339,1361 1000,1395
  rectangle net 3.3V: 907,1272 1000,1394
  rectangle net GND: 1301,2190 1504,2404
  rectangle net 3.3V: 2154,1271 2409,1330
  rectangle net 3.3V: 2050,1317 2409,1361
  rectangle net 3.3V: 5390.2,1368 7264,1571
  rectangle net GND: 4926,2260 5630,2349
  rectangle net GND: 4926,2225 4973,2349
  rectangle net GND: 4776,2314 5630,2349
  rectangle net GND: 4776,2152 4818,2349
  rectangle net 3.3V: 7031,2110 7298,2152
  rectangle net GND: 6717,2427 7093,2546
  rectangle net GND: 6717,2490 7913,2559
  rectangle net GND: 7279,2490 7917,2598
  rectangle net 3.3V: 4829,2125 4918,2298
  rectangle net 3.3V: 4787,1937 4877,2137
  rectangle net BATT: 1419,1677 1543,1733
  rectangle net BATT: 1419,1636 1543,1733
  rectangle net 3.3V: 1295,1025 1331,1304
  rectangle net 3.3V: 1147,1272 1331,1304
  rectangle net 3.3V: 2723,1024 2759,1303
  rectangle net 3.3V: 2579,1271 2759,1303
  rectangle net 3.3V: 4144.2,1026.5 4180.2,1305.5
  rectangle net 3.3V: 4000.2,1273.5 4180.2,1305.5
  rectangle net 3.3V: 5534.2,1026 5731,1305
  rectangle net 3.3V: 5390.2,1273 5731,1405
  rectangle net 3.3V: 6972,1025 7264,1405
  rectangle net 3.3V: 6826,1272 7012,1405
  rectangle net 3.3V: 8270,1272 8450,1405
  rectangle net 3.3V: 8414,1025 8450,1304
  region net 24V: 6173.53,478 5837.53,478 5837.53,5 6173.53,5
  region net 24V: 6173.53,5 6173.53,287 4425.53,287 4425.53,5
  rectangle net 24V: 2907.67,5 3243.67,478
  rectangle net 24V: 4320.4,5 4775,478
  region net 24V: 4655.67,5 4655.67,287 2907.67,287 2907.67,5
  region net 12V: 1760,5 1760,287 12,287 12,5
  rectangle net 12V: 1424.73,5 1760.73,478
  rectangle net 12V: 12,5 348,478

## Silkscreen, mask and mechanical layers (free items; w line width, h text height)
Top Overlay:
  drawing of 3237 lines, arcs and shapes, not listed
  text "KEYPAD HEADER" at 4848.06,2617.12 h60
  text "LCD HEADER" at 6481,2617.12 h60
  text "PROGRAMING HEADER" at 5769,2571 h60
  text "RESET" at 4024.74,2543.56 h60
  text "BOOT0" at 4418,2537.56 h60
  text "VALVE MANUAL CONTROL" at 1644,2446 h60
  text "SCHEDULE DOWNLOAD" at 2823.28,2446 h60
  text "STOP BUTTON" at 2238,2444 h60
  text "POWER INPUT" at 574,2389.57 h60
  text "SIDE-MAIN PCB CONNECTOR" at 8522.56,2095 h60 r90
  text "ZERO CARBON FOOTPRINT" at 6729,1556 h38
  text "RS485 CH1" at 714,481.34 h60
  text "RS485 CH2" at 2162.33,481.34 h60
  text "RS485 CH3" at 3645.27,481.34 h60
  text "RS485 CH4" at 5128.2,481.34 h60
  text "RS485 CH5" at 6611.13,481.34 h60
  text "RS485 CH6" at 8197,409 h60
Bottom Overlay:
  drawing of 3075 lines, arcs and shapes, not listed
  text "ZERO CARBON FOOTPRINT" at 4727,1389 h38
Board Outline:
  the board outline again, w10

## Dimensions
0,2778 to 0,0 on Dimension
0,2778 to 8760,2778 on Dimension